# EAGLE board 1794743520789_Budík (EAGLE 9.6.2)
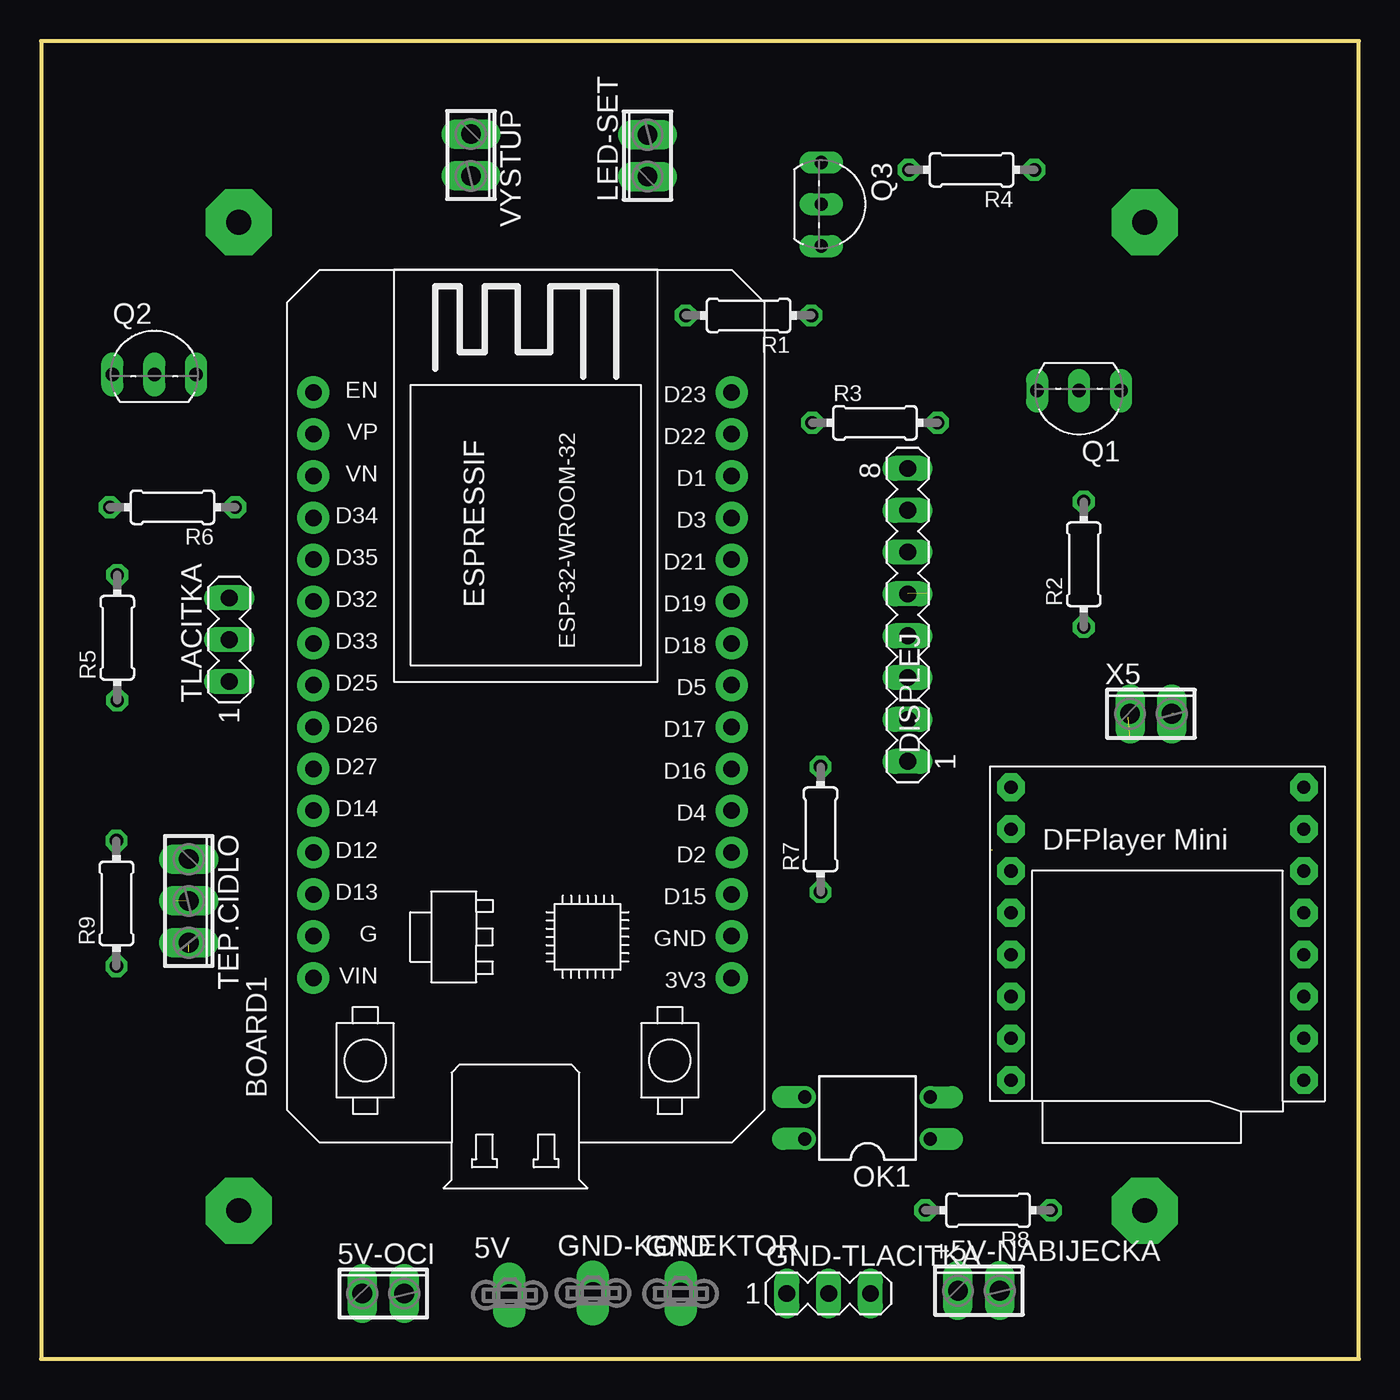
[diagram p0: board, top side]
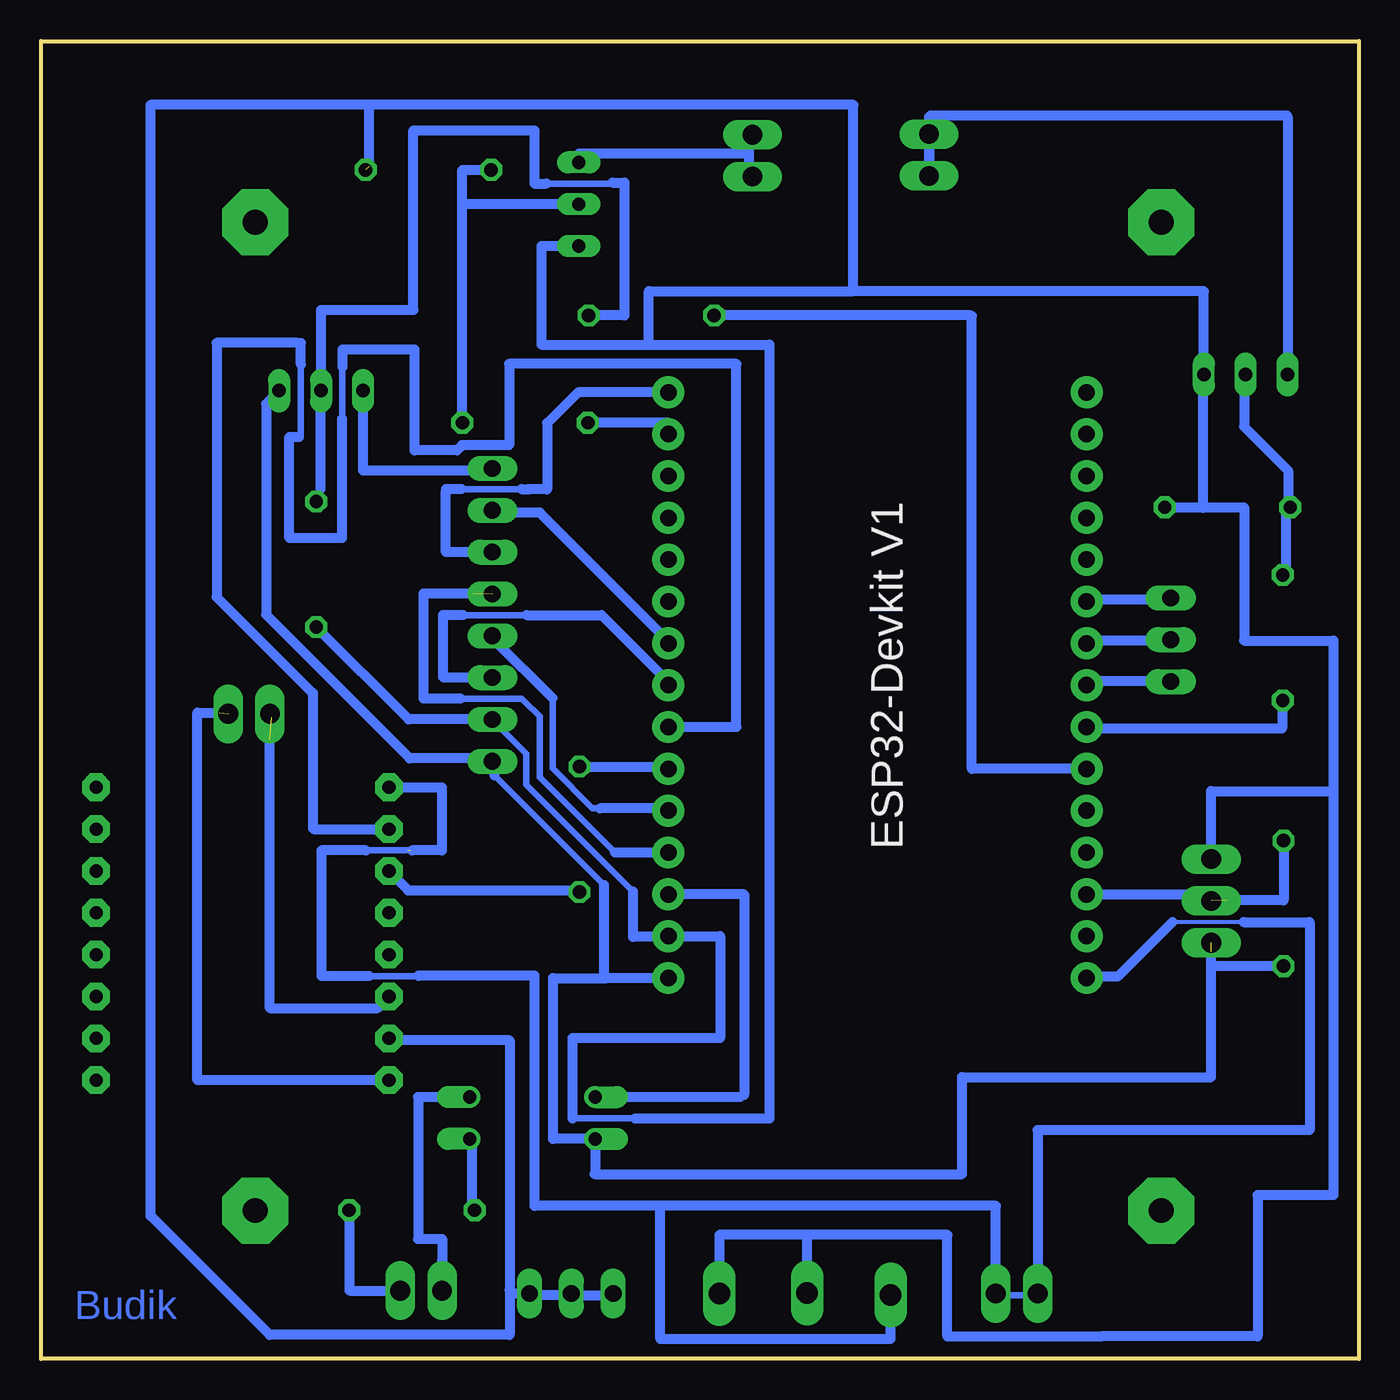
[diagram p1: board, bottom side, seen from below]

Size 80 x 80 mm. Coordinates in mm from the lower left corner, seen from the top.
Outline: 0,0 80,0 80,80 0,80 0,0
Copper layers (1*16): Top 0.035mm / dielectric 1.5mm / Bottom 0.035mm
Design rules "default": minimum track width 6mil, minimum drill 0.35mm, track to track 6mil, track to pad 6mil, pad to pad 6mil, via to via 6mil, smd to smd 6mil, copper to edge 40mil, drill to drill 6mil, minimum pad ring 10mil, minimum via ring 8mil, stop-mask expansion 4mil, vias tented up to drill 0mil, thermal gap 10mil
Net classes: 0 default: width 0.4 mm, drill 0.1 mm, clearance 0.1 mm

## Footprints (pad centres in the part's own frame; a part is rotated, then mirrored left to right if it is on the bottom)
ST2,8 = drill 1.321 long: 1 0,0
2POL254 = drill 1.2 long: 1 -1.27,0; 2 1.27,0
ESP32-DEVKITV1 = drill 1 pad 1.93: 3V3 0,0; D1 30.48,0; D2 7.62,0; D3 27.94,0; D4 10.16,0; D5 17.78,0; D12 7.62,25.4; D13 5.08,25.4; D14 10.16,25.4; D15 5.08,0; D16 12.7,0; D17 15.24,0; D18 20.32,0; D19 22.86,0; D21 25.4,0; D22 33.02,0; D23 35.56,0; D25 17.78,25.4; D26 15.24,25.4; D27 12.7,25.4; D32 22.86,25.4; D33 20.32,25.4; D34 27.94,25.4; D35 25.4,25.4; EN 35.56,25.4; GND 2.54,25.4; GND@1 2.54,0; VIN 0,25.4; VN 30.48,25.4; VP 33.02,25.4
MA08-1 = drill 1.016 long: 1 -8.89,0; 2 -6.35,0; 3 -3.81,0; 4 -1.27,0; 5 1.27,0; 6 3.81,0; 7 6.35,0; 8 8.89,0
MA03-1 = drill 1.016 long: 1 -2.54,0; 2 0,0; 3 2.54,0
DIL04 = drill 0.813 offset: 1 -1.27,-3.81; 2 1.27,-3.81; 3 1.27,3.81; 4 -1.27,3.81
TO92-EBC = drill 0.813 long: B 0,-1.27; C -2.54,-1.27; E 2.54,-1.27
0204/7 = drill 0.813 octagon: 1 -3.81,0; 2 3.81,0
3POL254 = drill 1.2 long: 1 -2.54,0; 2 0,0; 3 2.54,0
DFPLAYER = drill 0.8 pad 1.676 octagon: ADKEY1 8.89,-1.27; ADKEY2 8.89,1.27; BUSY 8.89,8.89; DAC_L -8.89,-1.27; DAC_R -8.89,1.27; GND_1 -8.89,-6.35; GND_2 8.89,-6.35; IO1 8.89,-8.89; IO2 8.89,-3.81; RX -8.89,6.35; SPK1 -8.89,-3.81; SPK2 -8.89,-8.89; TX -8.89,3.81; USB+ 8.89,3.81; USB- 8.89,6.35; VCC -8.89,8.89

## Placement (x,y rotation side)
5V  [ST2,8]  28.43,3.87 0 top
5V-OCI  [2POL254]  20.77,3.96 0 top
+5V-NABIJECKA  [2POL254]  56.93,4.14 0 top
BOARD1  ESP32DEVKITV1  [ESP32-DEVKITV1]  41.92,23.12 90 top
DISPLEJ  [MA08-1]  52.61,45.17 90 top
GND  [ST2,8]  38.82,3.96 0 top
GND-KONEKTOR  [ST2,8]  33.5,4 0 top
GND-TLACITKA  [MA03-1]  47.81,3.97 0 top
LED-SET  [2POL254]  36.81,73.05 90 top
OK1  PC817  [DIL04]  50.17,14.62 90 top
Q1  BC546A  [TO92-EBC]  63.01,57.51 180 top
Q2  BC546A  [TO92-EBC]  6.87,61.04 0 top
Q3  BC546A  [TO92-EBC]  48.63,70.1 270 top
R1  2,2k  [0204/7]  42.95,63.35 180 top
R2  10K  [0204/7]  63.3,48.24 90 top
R3  2k2  [0204/7]  50.62,56.83 0 top
R4  10k  [0204/7]  56.49,72.19 180 top
R5  150  [0204/7]  4.62,43.78 90 top
R6  10k  [0204/7]  7.97,51.7 180 top
R7  1k  [0204/7]  47.32,32.15 90 top
R8  10k  [0204/7]  57.49,9.02 180 top
R9  4k7  [0204/7]  4.57,27.65 90 top
TEP.CIDLO  [3POL254]  8.96,27.8 270 top
TLACITKA  [MA03-1]  11.42,43.66 90 top
U$1  DFPLAYER  [DFPLAYER]  67.77,25.81 0 top
VYSTUP  [2POL254]  26.09,73.09 270 top
X5  [2POL254]  67.38,39.16 0 top

## Library data of the parts
5V GND GND-KONEKTOR = con-rib; OC_FARNELL: unknown; OC_NEWARK: unknown
5V-OCI +5V-NABIJECKA LED-SET TEP.CIDLO VYSTUP X5 = con-phoenix-254; OC_FARNELL: unknown; OC_NEWARK: unknown
BOARD1 = ESP32-DEVKITV1
DISPLEJ GND-TLACITKA TLACITKA = con-lstb; OC_FARNELL: unknown; OC_NEWARK: unknown
OK1 = optocoupler; MPN: PC817X4J000F; OC_FARNELL: 9707727; OC_NEWARK: 97K7059
Q1-Q3 = transistor-npn
R1-R9 = rcl; SPICEPREFIX: R
U$1 = DFPlayer_v1

## Nets
GND: BOARD1.GND@1 DISPLEJ.2 GND-KONEKTOR.1 GND-TLACITKA.1 GND-TLACITKA.2 GND-TLACITKA.3 GND.1 Q2.E Q3.E R2.1 R4.1 R6.1 TEP.CIDLO.1 U$1.GND_1
N$1: 5V-OCI.1 5V-OCI.2 5V.1 BOARD1.VIN U$1.VCC
N$2: Q3.B R3.2 R4.2
N$3: Q2.B R5.2 R6.2
N$4: +5V-NABIJECKA.2 R8.1
N$5: OK1.1 R8.2
N$6: U$1.SPK1 X5.1
N$7: U$1.SPK2 X5.2
N$8: BOARD1.3V3 DISPLEJ.1 OK1.4 Q1.C R9.1 TEP.CIDLO.3
N$9: BOARD1.D15 OK1.3
N$10: BOARD1.D5 DISPLEJ.3
N$11: BOARD1.D4 DISPLEJ.4
N$12: BOARD1.D2 DISPLEJ.5
N$13: BOARD1.D23 DISPLEJ.6
N$14: BOARD1.D18 DISPLEJ.7
N$15: DISPLEJ.8 Q1.E
N$16: R7.1 U$1.TX
N$17: BOARD1.D17 U$1.RX
N$18: BOARD1.D16 R7.2
N$19: BOARD1.D13 R9.2 TEP.CIDLO.2
N$20: BOARD1.D25 TLACITKA.1
N$21: BOARD1.D33 TLACITKA.2
N$22: BOARD1.D32 TLACITKA.3
N$23: BOARD1.D27 R1.2
N$24: Q1.B R1.1 R2.2
N$25: BOARD1.D22 R3.1
N$26: BOARD1.D26 R5.1
N$27: Q2.C VYSTUP.1 VYSTUP.2
N$28: LED-SET.1 LED-SET.2 Q3.C
N$29: +5V-NABIJECKA.1 OK1.2

## Tracks (layer width: path | path; a pad name or v marks a point on that pad's centre or on a via)
GND  (1 unrouted)
  Bottom 0.4: 44.07,25.61 44.05,25.66 | 52.48,38.67 DISPLEJ.2 | 45.3,3.87 GND-TLACITKA.1 | 47.78,3.87 GND-TLACITKA.2 48.06,3.87 | 50.27,3.87 GND-TLACITKA.3 | 58.83,19.33 U$1.GND_1 59.25,19.46 | 9.46,59.75 Q2.E | 9.42,64.82 9.41,64.81 | Q3.E 47.51,67.39 | 60.12,76.08 60.06,76.14 | 11.6,51.65 R6.1 | 15.65,1.37 15.31,1.37 | 43.96,14.6 47.74,14.6
  Bottom 0.406: 44.07,28.38 50.55,34.85 50.55,36.73 52.48,38.67
  Bottom 0.61: 44.07,28.38 44.07,25.61 | 44.05,25.66 BOARD1.GND@1 38.77,25.66 38.77,19.49 47.74,19.49 47.74,14.6 | 47.78,3.87 45.3,3.87 | 48.06,3.87 50.27,3.87 | 58.83,19.33 51.55,19.33 51.55,4.18 | 51.55,4.18 51.32,3.97 GND-TLACITKA.3 | 9.46,59.75 9.46,51.66 9.5,51.7 R6.1 6.96,51.7 6.96,43.6 1.54,43.6 1.54,34.47 | 9.42,64.82 30.68,64.82 | Q2.E 9.41,64.81 | 60.12,76.08 60.12,72.37 | 30.68,64.82 30.68,76.14 60.06,76.14 73.36,76.14 73.36,8.68 66.13,1.45 51.55,1.45 51.55,4.18 | 33.5,7.52 24.98,7.52 24.98,1.37 15.65,1.37 6.14,1.37 6.14,9.94 1.54,9.94 1.54,34.47 | 33.5,7.52 38.82,7.52 GND.1 | Q3.E 49.63,67.56 49.63,61.58 43.11,61.58 | 43.11,61.58 35.77,61.58 35.77,14.6 43.96,14.6 | 43.11,61.58 43.11,64.82 30.68,64.82 | TEP.CIDLO.1 8.96,34.47 1.54,34.47 | DISPLEJ.2 57.69,38.82 R2.1 | GND-KONEKTOR.1 33.5,7.52
N$1  (1 unrouted)
  Bottom 0.254: 6.99,26.52 11.32,26.52
  Bottom 0.4: 5V-OCI.1 19.61,3.87 21.82,3.87 5V-OCI.2 | 5.8,26.52 6.99,26.52 | 16.3,23.2 BOARD1.VIN | 55.67,34.7 55.67,34.46 | 57.75,30.86 60.28,30.86 | 60.1,23.24 57.1,23.24 | 28.45,3.87 5V.1 28.43,2.2 | 57.48,30.86 57.59,30.86
  Bottom 0.61: 16.3,23.2 14.64,23.2 11.32,26.52 | 6.99,26.52 2.98,26.52 2.98,13.88 19.5,13.88 5V-OCI.1 | 5V-OCI.2 22.04,9.29 42.41,9.29 | 57.1,23.24 57.1,23.26 50.04,23.26 50.04,9.29 42.41,9.29 | 42.41,9.29 42.41,1.22 28.43,1.22 28.43,2.2 | U$1.VCC 55.67,34.7 | 55.67,34.46 55.67,30.86 57.48,30.86 | 60.28,30.86 62.99,30.86 62.99,23.24 60.1,23.24
N$2
  Bottom 0.4: 47.51,70.16 Q3.B | 52.48,72.09 R4.2 | 54.41,56.9 R3.2
  Bottom 0.61: R3.2 54.43,70.1 | R4.2 54.43,72.19 54.43,70.13 54.43,70.1 | Q3.B 54.43,70.1
N$3
  Bottom 0.4: 4.42,51.65 R6.2 | 4.42,47.78 R5.2
  Bottom 0.61: 4.42,47.78 4.42,51.65 | Q2.B 6.97,59.67 6.97,56.6 4.29,53.93 4.29,51.83 R6.2
N$4
  Bottom 0.4: 61.27,9 R8.1
  Bottom 0.61: 61.27,9 61.27,4.14 +5V-NABIJECKA.2
N$5
  Bottom 0.4: 53.86,9.12 R8.2 | 53.86,13.26 OK1.1
  Bottom 0.61: 53.86,13.26 53.86,9.12
N$6  (1 unrouted)
  Bottom 0.4: 59.11,22.1 U$1.SPK1 | 66.01,38.94 X5.1
  Bottom 0.61: U$1.SPK1 59.58,21.3 66.12,21.3 66.12,37.58
N$7  (1 unrouted)
  Bottom 0.61: U$1.SPK2 70.52,16.92 70.52,39.23 69.19,39.23
N$8  (1 unrouted)
  Bottom 0.4: 52.75,36.46 DISPLEJ.1 52.48,36.18 | 46.4,13.53 OK1.4 | 41.98,22.93 BOARD1.3V3
  Bottom 0.406: 45.81,28.75 52.48,35.42
  Bottom 0.61: Q1.C 66.35,57.98 66.35,45.18 57.63,36.46 52.75,36.46 | 52.48,35.42 52.48,36.18 | 45.81,28.75 45.81,23.26 45.67,23.12 | BOARD1.3V3 45.67,23.12 | 8.97,23.84 8.97,17.11 24.09,17.11 24.09,11.22 46.4,11.22 46.36,11.26 OK1.4 48.91,13.35 48.91,23.12 45.67,23.12 | 8.97,23.84 8.97,24.7 | R9.1 8.97,23.84
N$9
  Bottom 0.4: 37.58,15.89 37.32,16.03
  Bottom 0.61: 37.32,16.03 37.32,28.2 BOARD1.D15 | 37.58,15.89 OK1.3
N$10
  Bottom 0.4: 50.53,45.15 54.38,45.15 | 55.62,41.39 55.56,41.36 53.68,41.36 DISPLEJ.3 | 41.98,41.15 BOARD1.D5
  Bottom 0.61: 41.98,41.15 45.98,45.15 50.53,45.15 | 54.38,45.15 55.62,45.15 55.62,41.39 53.68,41.39 53.68,41.36
N$11
  Bottom 0.4: 48.95,40.12 48.95,35.84 46.53,33.42 46.07,33.42 | 52.48,43.64 DISPLEJ.4 | 41.98,33.42 BOARD1.D4
  Bottom 0.61: 48.95,40.12 52.48,43.64 | 41.98,33.42 46.07,33.42
N$12  (1 unrouted)
  Bottom 0.4: 50.63,39.9 50.82,40.09 54.53,40.09
  Bottom 0.406: 50.63,39.9 49.73,39 49.73,35.32 45.15,30.74
  Bottom 0.61: BOARD1.D2 45.15,30.74 | 54.53,40.09 56.78,40.09 56.78,46.47 53.76,46.47
N$13
  Bottom 0.4: 55.43,52.67 55.43,52.8 | 54.49,52.8 50.84,52.8
  Bottom 0.61: BOARD1.D23 47.4,58.68 49.28,56.8 49.28,52.78 50.43,52.78 50.43,52.8 50.84,52.8 | DISPLEJ.6 55.43,48.98 55.43,52.67 | 54.49,52.8 55.43,52.8
N$14
  Bottom 0.4: 52.48,51.37 DISPLEJ.7 | 41.98,43.64 BOARD1.D18
  Bottom 0.61: 52.48,51.37 49.72,51.37 41.98,43.64
N$15
  Bottom 0.61: Q1.E 60.47,53.95 52.73,53.95 DISPLEJ.8
N$16
  Bottom 0.4: 47.51,28.45 R7.1 | 58.83,29.55 U$1.TX
  Bottom 0.61: 47.51,28.45 57.73,28.45 58.83,29.55
N$17
  Bottom 0.4: 59.46,32.16 U$1.RX | 63.51,32.21 63.46,32.16 | 64.41,61.62 64.47,61.68 | 61.71,60.23 61.71,57.06 61.75,57.06 | 64.35,55.98 64.23,55.98 64.23,60.37
  Bottom 0.61: BOARD1.D17 37.79,38.36 37.79,60.4 51.59,60.4 51.59,55.48 54.44,55.48 54.76,55.16 57.33,55.16 57.33,61.28 61.71,61.28 61.71,60.23 | 61.75,57.06 61.75,49.83 64.93,49.83 64.93,55.98 64.35,55.98 | 64.23,60.37 64.23,61.68 64.47,61.68 69.34,61.68 69.34,46.25 63.51,40.41 63.51,32.21 | 63.46,32.16 59.46,32.16
N$18
  Bottom 0.4: 47.23,35.91 R7.2 | 41.98,35.91 BOARD1.D16
  Bottom 0.61: 41.98,35.91 47.23,35.91
N$19  (1 unrouted)
  Bottom 0.4: 16.3,28.17 BOARD1.D13
  Bottom 0.61: R9.2 4.57,27.83 8,27.83 | TEP.CIDLO.2 8.96,28.17 16.3,28.17
N$20
  Bottom 0.4: 11.6,41.15 TLACITKA.1 | 16.3,41.15 BOARD1.D25
  Bottom 0.61: 16.3,41.15 11.6,41.15
N$21
  Bottom 0.4: 11.6,43.64 TLACITKA.2 | 16.3,43.64 BOARD1.D33
  Bottom 0.61: 16.3,43.64 11.6,43.64
N$22
  Bottom 0.4: 11.6,46.12 TLACITKA.3 | 16.3,46.12 BOARD1.D32
  Bottom 0.61: 16.3,46.12 11.6,46.12
N$23
  Bottom 0.4: 23.55,63.35 23.49,63.32
  Bottom 0.61: 23.49,63.32 23.49,35.82 BOARD1.D27 | 23.55,63.35 R1.2
N$24
  Bottom 0.4: 63.05,52.81 R2.2 | 63.05,58.74 Q1.B 62.97,58.83 | 46.68,63.53 R1.1
  Bottom 0.406: 49.33,71.35 45.32,71.35 45.32,71.41
  Bottom 0.61: 63.05,58.74 63.05,52.81 | Q1.B 63.01,63.69 57.4,63.69 57.4,74.58 50.05,74.58 50.05,71.35 49.33,71.35 | 45.32,71.41 44.59,71.41 44.59,63.35 R1.1
N$25
  Bottom 0.61: BOARD1.D22 41.92,56.83 R3.1
N$26
  Bottom 0.4: BOARD1.D26 16.43,38.27 | 4.66,38.27 4.62,38.38
  Bottom 0.61: 16.43,38.27 4.66,38.27 | 4.62,38.38 R5.1
N$27
  Bottom 0.4: 26.09,75.4 26,75.49 | 4.37,75.49 4.33,75.42 | VYSTUP.1 25.96,74.3 25.96,72.09 VYSTUP.2
  Bottom 0.61: VYSTUP.2 26.09,75.4 | 26,75.49 4.37,75.49 | 4.33,75.42 Q2.C
N$28
  Bottom 0.4: 37.56,72.36 37.01,71.81 LED-SET.1 37.01,72.09 | 47.23,72.36 Q3.C | 37.01,74.3 LED-SET.2
  Bottom 0.61: 37.01,72.09 37.01,73.19 | 37.01,73.19 37.01,74.3 | Q3.C 47.36,73.19 37.01,73.19
N$29
  Bottom 0.61: OK1.2 57.11,15.89 57.11,7.28 55.66,7.28 55.66,5.98 55.66,4.87 +5V-NABIJECKA.1
N$30  (via drill 1.5 pad 4)
  other vias: 12,9
N$31  (via drill 1.5 pad 4)
  other vias: 67,9
N$32  (via drill 1.5 pad 4)
  other vias: 12,69
N$33  (via drill 1.5 pad 4)
  other vias: 67,69

## Text on the board
Bottom: Budik